# Altium PCB ProbeHead.PcbDoc (part 2 of 2)
Units mm, origin at the board's own origin, x right, y up, seen from the top; angles counter-clockwise.
Board outline 70 x 35 mm, 4 copper layers (L1, L2, L3, L4), stack 1.883 mm thick; 107 components, 62 nets, 327 pads, 211 vias.
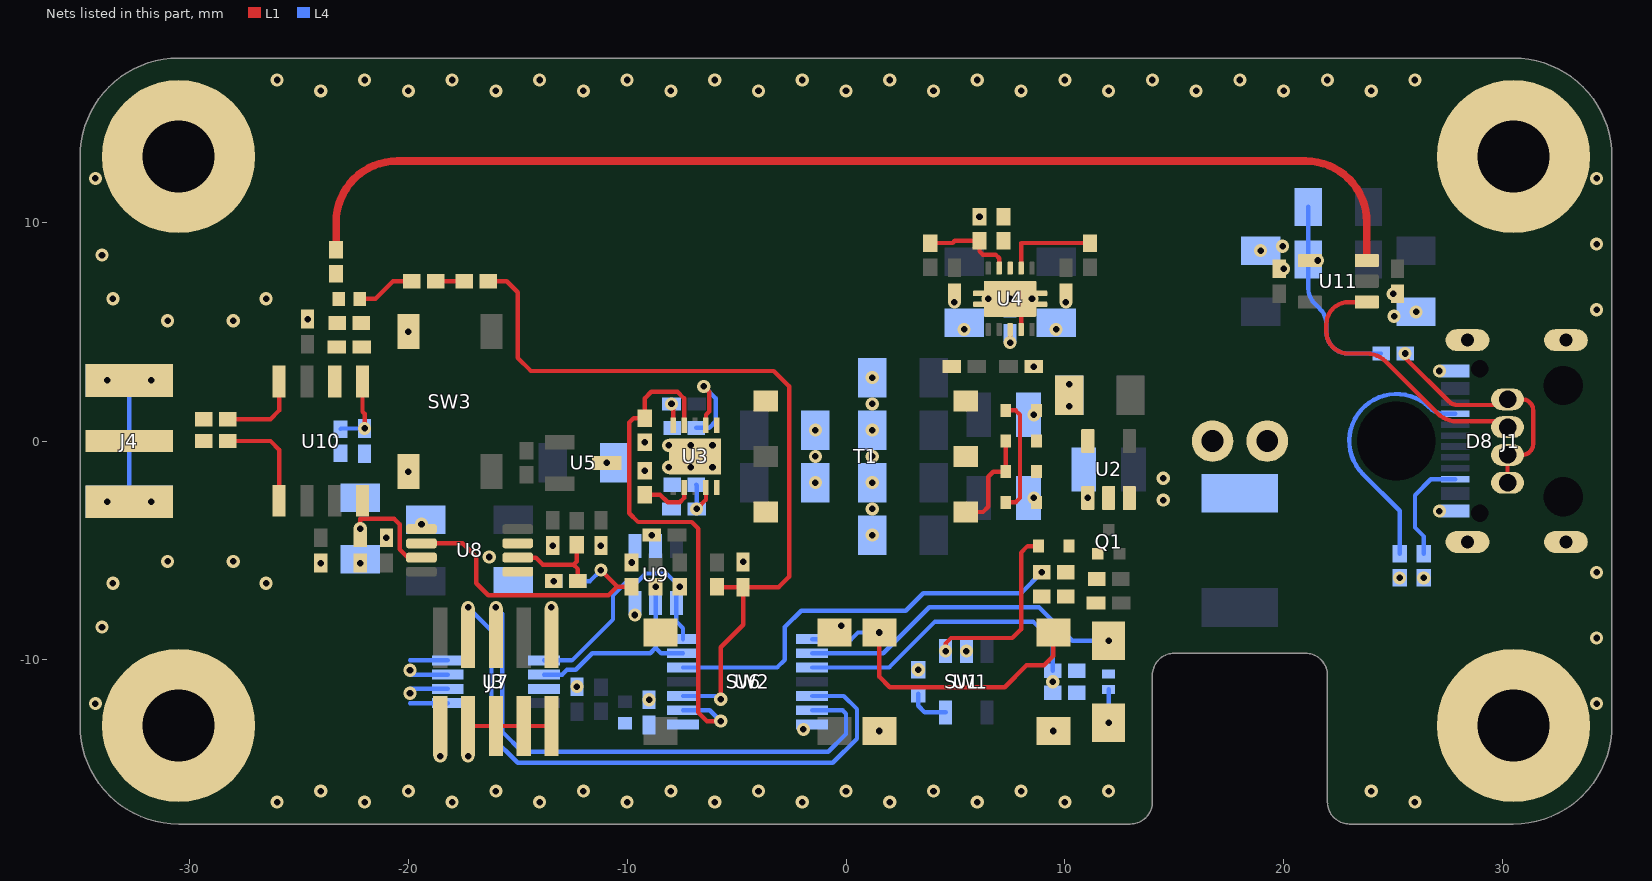
[diagram p4: the nets of this part, all layers, seen from the top]

## Via types
v1: diameter 0.6, hole 0.3, L1 to L4, tented both sides, 211 vias

## Nets (pads, with @x,y where several pads share a name; then routed paths per layer and width w, separated by ;. In a path a pad name is that pad's centre, name@x,y a point inside that pad or via, vN(x,y) a via of type N, cw(c..) or ccw(c..) an arc to the next point about the centre after c; other vN are vias at no path point) (continued)
AMP.EN: R5.2 U3.4 U6.2 | length 24.1
  L1 w0.2: U3.4@-7.4,0.725 -7.4,1.95 -7.7,2.25 -8.9,2.25 -9.2,1.95 R5.2@-9.2,1.05 -9.7,1.05 -9.9,0.85 -9.9,-3.3 -9.5,-3.7 -7.05,-3.7 -6.75,-4 -6.75,-12.4 -6.35,-12.8 v1(-5.725,-12.8)
  L4 w0.2: U6.2@-7.45,-12.3 -6.225,-12.3 v1(-5.725,-12.8)
AMP.IN_N: R27.2 U10.8 | length 3.8
  L1 w0.2: R27.2@-28.25,1 -26.3,1 -25.905,1.395 U10.8@-25.905,2.725
AMP.IN_P: R26.2 U10.1 | length 4.8
  L1 w0.2: R26.2@-28.25,0 -26.3,0 -25.905,-0.395 U10.1@-25.905,-2.725
AMP.OFFSET: C38.2 R16.1 R34.1 U6.3 | length 37
  L1 w0.2: R34.1@-16.35,7.3 -15.5,7.3 -15,6.8 -15,3.8 -14.4,3.2 -3.3,3.2 -2.6,2.5 -2.6,-6.2 -3.075,-6.675 C38.2@-4.7,-6.675 ; R16.1@-5.9,-6.65 -5.875,-6.675 C38.2@-4.7,-6.675 ; v1(-5.725,-11.8) -5.725,-9.425 -4.7,-8.4 C38.2@-4.7,-6.675
  L4 w0.2: U6.3@-7.45,-11.65 -5.983,-11.65 -5.833,-11.8 v1(-5.725,-11.8)
AMP.OUT: R33.2 U11.3 | length 53.3
  L1 w0.349: R33.2@-23.3,8.75 -23.3,10 cw(c-20.5,10) -20.5,12.8 21,12.8 cw(c21,10) 23.8,10 U11.3@23.8,8.25
AMP.REF: C24.2 C30.1 C32.2 R28.1 U8.7 U10.4 | length 4.7
  L1 w0.2: v1(-22.2,-4) -22.2,-3.55 -20.65,-3.55 -20.4,-3.8 -20.4,-4.95 -20.025,-5.325 U8.7@-19.4,-5.325
COM: C2.1 C3.1 C4.1 C5.1 C6.1 C7.1 C8.1 C9.2 C10.2 C11.1 C12.1 C13.2 C14.1 C15.1 C16.1 C17.1 C18.2 C19.2 C20.2 C21.1 C22.1 C23.1 C24.1 C25.1 C26.1 C27.2 C28.2 C29.1 C31.2 C32.1 C34.1 C35.1 C36.2 C37.2 C38.1 J1.0 J1.A1/B12 J1.A12/B1 J2.2 J3.1 J3.3 J3.5 J3.7 J3.9 J3.10 pad. R2.1 R5.1 R6.1 R7.1 R8.1 R9.1 R10.1 R13.1 SW1.3 SW1.4 SW2.1 SW2.2 SW3.1 SW3.2 T1.5 U1.2 U2.2 U2.3 U2.5 U3.5 U3.11 U4.4 U4.11 U5.3 U6.14 U7.1 U7.2 U7.3 U7.4 U7.7 U8.3 U8.5 U9.2 U9.6 | length 13.6
  L1 w0.2: J3.3@-17.27,-13.02 J3.5@-16,-13.02 J3.7@-14.73,-13.02 J3.9@-13.46,-13.02 ; v1(-7.975,1.7) -7.9,1.625 U3.5@-7.9,0.725 ; v1(7.5,6.5) 8,6.5 U4.4@8,5.1
  L4 w0.2: -19.925,-11.975 U7.1@-18.2,-11.975 ; v1@-19.925,-11.325 U7.2@-18.2,-11.325 ; v1@-19.925,-10.675 U7.3@-18.2,-10.675 ; -19.925,-10.025 U7.4@-18.2,-10.025
  other v1: -26,-16.5 -22,-16.5 -18,-16.5 -14,-16.5 -10,-16.5 -6,-16.5 -2,-16.5 2,-16.5 6,-16.5 10,-16.5 26,-16.5 -24,-16 -20,-16 -16,-16 -12,-16 -8,-16 -4,-16 0,-16 4,-16 8,-16 12,-16 24,-16 -18.54,-14.4 -17.27,-14.4 1.525,-13.25 9.475,-13.25 -1.95,-13.175 -34.3,-12 34.3,-12 -9,-11.825 -19.925,-11.525 -12.3,-11.225 -19.925,-10.475 3.3,-10.45 5.5,-9.6 34.3,-9 -34,-8.5 -0.225,-8.45 -9.65,-7.95 -13.46,-7.6 -33.5,-6.5 -26.5,-6.5 25.3,-6.25 26.4,-6.25 34.3,-6 -24,-5.575 -22.2,-5.575 -4.7,-5.525 -31,-5.5 -28,-5.5 -16.3,-5.3 -13.4,-4.775 -11.2,-4.775 -21,-4.425 -8.875,-4.3 1.2,-4.3 -19.4,-3.8 27.116,-3.2 1.2,-3.1 14.5,-2.7 -1.4,-1.9 1.2,-1.9 14.5,-1.7 -20,-1.4 -9.2,-1.35 -8.1,-1.2 -7.1,-1.2 -6.1,-1.2 -10.925,-1 -1.4,-0.7 1.2,-0.7 -8.1,-0.2 -7.1,-0.2 -6.1,-0.2 -9.2,-0.05 -1.4,0.5 1.2,0.5 10.2,1.6 1.2,1.7 10.2,2.6 1.2,2.9 27.116,3.2 8.575,3.4 -20,5 5.4,5.1 9.6,5.1 -31,5.5 -28,5.5 -24.6,5.575 25.05,5.7 26.05,5.9 34.3,6 4.95,6.35 10.05,6.35 -33.5,6.5 -26.5,6.5 6.5,6.5 8.5,6.5 25,6.725 20,7.875 -34,8.5 18.95,8.7 19.95,8.9 34.3,9 6.1,10.25 -34.3,12 34.3,12 -24,16 -20,16 -16,16 -12,16 -8,16 -4,16 0,16 4,16 8,16 12,16 16,16 20,16 24,16 -26,16.5 -22,16.5 -18,16.5 -14,16.5 -10,16.5 -6,16.5 -2,16.5 2,16.5 6,16.5 10,16.5 14,16.5 18,16.5 22,16.5 26,16.5
I2C.SCL: R19.1 U6.6 U7.6 U9.5 | length 9.8
  L4 w0.2: U7.6@-13.8,-10.675 -12.975,-10.675 -12.75,-10.45 -12.349,-10.45 -11.599,-9.7 -8.95,-9.7 -8.7,-9.45 ; v1(-8.7,-6.65) U9.5@-8.7,-7.4 -8.7,-9.45 ; U6.6@-7.45,-9.7 -8.45,-9.7 -8.7,-9.45
I2C.SDA: R18.1 U6.7 U7.5 U9.4 | length 11.3
  L4 w0.2: U7.5@-13.8,-10.025 -12.525,-10.025 -10.65,-8.15 -10.65,-7.05 -10.1,-6.5 -9.6,-6.5 -9.15,-6.05 -8.2,-6.05 v1(-7.6,-6.65) -7.75,-6.8 U9.4@-7.75,-7.4 -7.75,-8.25 -7.45,-8.55 U6.7@-7.45,-9.05
IN_N: J4.2 R27.1 | length 5.5
  L4 w0.2: J4.2@-32.75,-2.77 J4.2@-32.75,2.77
  other v1: -33.75,-2.77 -31.75,-2.77 -33.75,2.77 -31.75,2.77
IN_P: J4.1 R26.1
LED.GRN: R20.2 R21.2 U6.10 | length 13.6
  L4 w0.2: U6.10@-1.55,-10.35 1.969,-10.35 4.069,-8.25 8.55,-8.25 9.45,-9.15 R21.2@9.45,-10.5
  other v1: 9.45,-11
LED.RED: D7.2 U6.9 | length 15.1
  L4 w0.2: U6.9@-1.55,-9.7 1.7,-9.7 3.8,-7.6 8.819,-7.6 10.344,-9.125 v1(12,-9.125)
NetC1_1: C1.1 D1.2 Q1.1 R1.1 R3.2 R4.1
NetC11_2: C11.2 R8.2 U3.9 | length 2.3
  L1 w0.2: v1(-6.825,-3.1) -6.4,-2.675 U3.9@-6.4,-2.125
  L4 w0.2: R8.2@-6.85,-2 -6.825,-2.025 v1(-6.825,-3.1)
NetC13_1: C13.1 U4.3 | length 0.6
  L1 w0.2: v1(7.5,4.5) U4.3@7.5,5.1
NetC21_2: C21.2 L4.2 U6.1
NetC30_2: C30.2 C33.1 R28.2 R29.1 U10.5 | length 3.3
  L1 w0.2: U10.5@-22.095,2.725 -22.095,1.345 -22,1.25 v1(-22,0.575)
  L4 w0.2: R28.2@-23.1,0.55 -23.075,0.575 v1(-22,0.575)
NetC33_2: C33.2 L5.2 R29.2 R33.1 U10.6
NetD1_1: D1.1 U1.1 | length 8.5
  L1 w0.2: v1(4.55,-9.6) 4.55,-9.25 4.8,-9 7.6,-9 8,-8.6 8,-5.1 8.3,-4.8 D1.1@8.8,-4.8
NetD2_1: D2.1 D3.1 L2.1
  other v1: 8.585,-2.6
NetD2_2: D2.2 D4.1 T1.6 | length 5.3
  L1 w0.2: D2.2@7.3,-2.8 7.75,-2.8 7.95,-2.6 7.95,1.2 7.75,1.4 D4.1@7.3,1.4
NetD3_2: D3.2 D5.1 T1.4 | length 4.8
  L1 w0.2: T1.4@5.47,-3.24 6.26,-3.24 6.5,-3 6.5,-1.63 6.73,-1.4 D3.2@7.3,-1.4 D5.1@7.3,0
NetD4_2: D4.2 D5.2 L3.1
  other v1: 8.585,1.2
NetD6_1: D6.1 D7.1 R20.1 | length 1.5
  L4 w0.2: v1(12,-12.875) D6.1@12,-11.35
NetD6_2: D6.2 R21.1
NetD8_1: D8.1 D8.2 D8.4 R30.2 | length 11.6
  L1 w0.2: v1(25.55,4) 25.55,3.811 27.564,1.796 ; 27.564,1.796 ccw(c27.918,2.15) 27.918,1.65 29.975,1.65 D8.4@30.23,1.905 30.9,1.905 cw(c30.9,1.405) 31.4,1.405 31.4,-0.135 cw(c30.9,-0.135) 30.9,-0.635 D8.2@30.23,-0.635 D8.1@30.23,-1.905
NetD8_3: D8.3 U11.1 | length 12.9
  L1 w0.2: U11.1@23.8,6.35 22.964,6.35 ccw(c22.964,5.35) 22.257,6.057 22.243,6.043 ccw(c22.95,5.336) 21.95,5.336 21.95,5 ccw(c22.95,5) 22.95,4 23.782,4 cw(c23.782,2.75) 24.666,3.634 27.034,1.266 ccw(c27.918,2.15) 27.918,0.9 D8.3@29.965,0.9 ; D8.3@30.565,0.9 D8.3@30.83,0.635
NetF1_1: F1.1 J2.1
NetJ1_A5: J1.A5 R7.2 | length 12.3
  L4 w0.2: R7.2@25.3,-5.15 25.3,-3.191 23.63,-1.52 cw(c25.15,0) 26.655,1.536 ccw(c27.355,2.25) 27.355,1.25 J1.A5@27.84,1.25
NetJ1_B5: J1.B5 R6.2 | length 5
  L4 w0.2: R6.2@26.41,-5.15 26.41,-4.362 26,-3.952 26,-2.476 26.726,-1.75 J1.B5@27.84,-1.75
NetL1_2: L1.2 U2.1
  other v1: 11.05,-2.6
NetL5_1: L5.1 R35.2 | length 2.7
  L1 w0.2: L5.1@-22.21,6.5 -21.5,6.5 -20.7,7.3 R35.2@-19.85,7.3
NetR2_2: R2.2 U1.5 | length 1.9
  L4 w0.2: R2.2@3.3,-11.55 3.3,-12.1 3.6,-12.4 U1.5@4.55,-12.4
NetR9_2: R9.2 U3.2 | length 4.8
  L1 w0.2: v1(-6.5,2.5) -6.25,2.25 -6.25,1.35 -6.4,1.2 U3.2@-6.4,0.725
  L4 w0.2: R9.2@-6.85,0.6 -6.25,0.6 -5.95,0.9 -5.95,1.95 v1(-6.5,2.5)
NetR10_2: R10.2 U3.7 | length 2.5
  L1 w0.2: R10.2@-9.2,-2.45 -8.5,-2.45 -8.15,-2.8 -7.6,-2.8 -7.4,-2.6 U3.7@-7.4,-2.125
NetR11_1: R11.1 R13.2 U4.9 | length 4.3
  L1 w0.2: R11.1@3.85,9.05 4.875,9.05 4.975,9.15 R13.2@6.1,9.15 6.1,8.674 6.254,8.52 6.835,8.52 7,8.355 U4.9@7,7.9
NetR14_1: R14.1 R15.2 U4.7 | length 4.3
  L1 w0.2: U4.7@8,7.9 8,9.05 R15.2@11.15,9.05
NetR14_2: R14.2 U4.8
NetR22_1: R22.1 R23.2 U8.2 | length 4.5
  L1 w0.2: U8.2@-15,-5.325 -14.177,-5.325 -13.85,-5.652 -12.448,-5.652 ; R23.2@-12.3,-4.75 -12.3,-5.503 -12.448,-5.652 ; R22.1@-12.25,-6.4 -12.25,-5.85 -12.448,-5.652
NetR22_2: R22.2 R24.1 U8.1
  other v1: -13.35,-6.4
NetR24_2: R24.2 R25.2 U8.6 | length 13.8
  L1 w0.2: U8.6@-19.4,-4.675 -17.525,-4.675 -16.9,-5.3 -16.9,-6.5 -16.35,-7.05 -10.85,-7.05 -10.45,-6.65 ; v1(-11.2,-5.9) -10.45,-6.65 ; R25.2@-9.8,-6.65 -10.45,-6.65
  L4 w0.2: R24.2@-12.25,-6.4 -11.7,-6.4 v1(-11.2,-5.9)
NetR25_1: R25.1 U9.1
  other v1: -9.8,-5.55
NetR30_1: R30.1 R31.2 R32.2 U11.4 | length 9
  L4 w0.2: R31.2@21.125,10.7 R32.2@21.125,8.3 21.125,6.989 ccw(c22.125,6.989) 21.418,6.282 21.657,6.043 cw(c20.95,5.336) 21.95,5.336 21.95,5 ccw(c22.95,5) 22.95,4 R30.1@24.45,4
  other v1: 21.55,8.25
NetR34_2: R34.2 R35.1 | length 1.3
  L1 w0.2: R35.1@-18.75,7.3 R34.2@-17.45,7.3
NetT1_1: T1.1 U3.1
NetT1_3: T1.3 U3.10
PIC.PGC: J3.4 U6.12 | length 27.6
  L4 w0.2: v1(-17.27,-7.6) -16.2,-8.67 -16.2,-13.5 -15,-14.7 -0.6,-14.7 0.5,-13.6 0.5,-12.25 -0.1,-11.65 U6.12@-1.55,-11.65
PIC.PGD: J3.6 U6.13 | length 24.8
  L4 w0.2: v1(-16,-7.6) -15.7,-7.9 -15.7,-13.293 -14.793,-14.2 -0.807,-14.2 0,-13.393 0,-12.457 -0.157,-12.3 U6.13@-1.55,-12.3
PWR.BTN: R4.2 SW1.1 SW1.2 U6.8 | length 15
  L1 w0.2: v1(1.525,-8.75) 1.525,-10.775 2,-11.25 7.25,-11.25 8.25,-10.25 9.05,-10.25 9.475,-9.825 SW1.2@9.475,-8.75
  L4 w0.2: U6.8@-1.55,-9.05 0.25,-9.05 0.55,-8.75 v1(1.525,-8.75)
PWR.LATCH: R3.1 U6.5 | length 19.1
  L4 w0.2: U6.5@-7.45,-10.35 -3.15,-10.35 -2.8,-10 -2.8,-8.5 -2.05,-7.75 2.731,-7.75 3.531,-6.95 8,-6.95 v1(8.95,-6)
pads on no net: D8. J1. J1.A6 J1.A7 J1.A8 J1.B6 J1.B7 J1.B8 U3.6 U3.8

## Polygon pours and split planes (outlines as drawn)
-5V0AMP on L3 "NONET_L-01_P-001" (solid, remove dead copper, pour order 31): -24.65,-4.217 -24.65,-2.717 -24.417,-2.484 -19.029,-2.484 -18.441,-1.896 -18.441,5.409 -14.5,9.35 16.35,9.35 16.825,9.825 24.125,9.825 24.6,9.35 26.95,9.35 26.95,7.45 22.55,7.45 22.55,8.375 21.75,9.175 20.45,9.175 20.45,7.45 18.05,7.45 18,7.5 6.5,7.5 6.5,8.75 4.3,8.75 4.3,7.45 -13.933,7.45 -16.475,4.908 -16.475,-1.896 -15.886,-2.484 -13.516,-2.484 -13,-3 -13,-4.235 -13.215,-4.45 -24.417,-4.45
COM on L3 "NONET_L-01_P-001" (solid, remove dead copper, pour order 30): -35,-17.5 -35,17.5 35,17.5 35,-17.5
+5V0AMP on L3 "NONET_L-01_P-001" (solid, remove dead copper, pour order 18): -25.405,-5.595 -24.35,-6.65 -12.304,-6.65 -9.275,-3.621 -9.275,3.975 -8,5.25 21,5.25 21,7.15 18.05,7.15 17.875,7.325 6.3,7.325 6.3,8.55 4.5,8.55 4.5,7.25 -8.85,7.25 -11.275,4.825 -11.275,0.225 -12.159,-0.659 -15.804,-0.659 -16.275,-1.13 -16.275,-1.813 -15.804,-2.284 -13.433,-2.284 -12.8,-2.917 -12.8,-4.318 -13.132,-4.65 -24.5,-4.65 -24.85,-4.3 -24.85,-2.634 -23.75,-1.534 -23.75,4.85 -25.405,4.85
+VUSB on L3 "NONET_L-01_P-001" (solid, remove dead copper, pour order 14): 6.15,-14.8 6.15,-11.85 12.5,-11.85 12.5,-10.7 cw(c15,-10.7) 15,-8.2 26.05,-8.2 27.989,-6.261 27.989,2.7 35,2.7 35,-3.8 33.8,-3.8 33.8,-6.014 cw(c32,-6.014) 32.1,-7.811 ccw(c32.5,-15) 25.955,-12 cw(c21.591,-10) 21.591,-14.8
+5V0 on L3 "NONET_L-01_P-001" (solid, remove dead copper, pour order 17): -18.865,-12.8 -10.875,-12.8 -10.875,-12.35 -10.72,-12.195 5.95,-12.195 5.95,-8.85 10.269,-8.85 ccw(c10.269,-7.05) 11.695,-8.15 cw(c15,-10.7) 13.65,-6.749 13.65,3 6.83,3 6.83,-5.4 4.43,-5.4 4.43,3 -8.15,3 -8.15,-4.3 -11.1,-7.25 -18.865,-7.25
+8V0AMP on L3 "NONET_L-01_P-001" (solid, remove dead copper, pour order 16): 4.63,-5.2 6.63,-5.2 6.63,4.65 4.63,4.65
+VBATT on L3 "NONET_L-01_P-001" (solid, remove dead copper, pour order 2): 6.15,-11.65 6.15,-9.05 10.269,-9.05 ccw(c10.269,-7.05) 11.853,-8.272 cw(c15,-10.7) 15,-6.725 19.75,-6.725 19.75,-8 15,-8 ccw(c15,-10.7) 12.3,-10.7 12.3,-11.65
COM on L4 "NONET_L-01_P-001" (solid, remove dead copper, pour order 24): -35,4.5 -35,13 cw(c-30.5,13) -30.5,17.5 30.5,17.5 cw(c30.5,13) 35,13 35,4 34,4 34,6.014 ccw(c32,6.014) 32.111,8.011 cw(c32.5,15) 26.137,12.083 ccw(c21.591,10) 21.591,15 -20.5,15 ccw(c-20.5,10) -25.5,10 -25.5,4.5
COM on L4 "NONET_L-01_P-001" (solid, remove dead copper, pour order 23): 22,-16.5 ccw(c23,-16.5) 23,-17.5 30.5,-17.5 ccw(c30.5,-13) 35,-13 35,-4 34,-4 34,-6.014 cw(c32,-6.014) 32.111,-8.011 ccw(c32.5,-15) 26.137,-12.083 cw(c21.591,-10) 22,-14.983
COM on L4 "NONET_L-01_P-001" (solid, remove dead copper, pour order 22): -35,-13 ccw(c-30.5,-13) -30.5,-17.5 13,-17.5 ccw(c13,-16.5) 14,-16.5 14,-15 -20.5,-15 cw(c-20.5,-10) -25.5,-10 -25.5,-4.5 -35,-4.5
COM on L1 "NONET_L-01_P-001" (solid, remove dead copper, pour order 26): -35,-13 ccw(c-30.5,-13) -30.5,-17.5 13,-17.5 ccw(c13,-16.5) 14,-16.5 14,-15 -20.5,-15 cw(c-20.5,-10) -25.5,-10 -25.5,-4.5 -35,-4.5
COM on L1 "NONET_L-01_P-001" (solid, remove dead copper, pour order 25): 22,-16.5 ccw(c23,-16.5) 23,-17.5 30.5,-17.5 ccw(c30.5,-13) 35,-13 35,-4 34,-4 34,-6.014 cw(c32,-6.014) 32.111,-8.011 ccw(c32.5,-15) 26.137,-12.083 cw(c21.591,-10) 22,-14.983
COM on L1 "NONET_L-01_P-001" (solid, remove dead copper, pour order 27): -35,4.5 -35,13 cw(c-30.5,13) -30.5,17.5 30.5,17.5 cw(c30.5,13) 35,13 35,4 34,4 34,6.014 ccw(c32,6.014) 32.111,8.011 cw(c32.5,15) 26.137,12.083 ccw(c21.591,10) 21.591,15 -20.5,15 ccw(c-20.5,10) -25.5,10 -25.5,4.5
COM on L2 "NONET_L-01_P-001" (solid, remove dead copper, pour order 0): -30.5,-17.5 13,-17.5 ccw(c13,-16.5) 14,-16.5 14,-10.7 cw(c15,-10.7) 15,-9.7 21,-9.7 cw(c21,-10.7) 22,-10.7 22,-16.5 ccw(c23,-16.5) 23,-17.5 30.5,-17.5 ccw(c30.5,-13) 35,-13 35,13 ccw(c30.5,13) 30.5,17.5 -30.5,17.5 ccw(c-30.5,13) -35,13 -35,-13 ccw(c-30.5,-13)

## Other copper
L1:
  rectangle net COM: 32.9,4.11 34.3,5.11
  rectangle net COM: 32.9,-5.11 34.3,-4.11
  region net COM: 18.05,7.45 18.05,9.35 20.4,9.35 20.4,7.45
  region net +5V0AMP: 18.05,5.25 20.4,5.25 20.4,7.15 18.05,7.15
  region net -5V0AMP: 24.6,7.45 24.6,9.35 26.95,9.35 26.95,7.45
  region net COM: 24.6,5.25 24.6,6.85 24.9,7.15 26.95,7.15 26.95,5.25
  region net +8V0AMP: 5.55,3.1 5.55,4.623 ccw(c5.4,5.1) 5.9,5.1 5.9,5.475 7.125,5.475 7.125,4.712 ccw(c7.5,4.5) 7.069,4.5 7.069,4.269 7,4.269 ccw(c7,4.069) 6.8,4.069 6.8,3.1
  region net NetT1_1: -6.025,0.375 -6.025,1.075 -5.9,1.2 -5.9,2.32 -3.11,2.32 -3.11,1.05 -4.85,1.05 ccw(c-4.85,0.8) -5.1,0.8 -5.1,0.375
  region net -8V0AMP: 7,3.1 7,4.069 7.5,4.069 ccw(c7.5,4.5) 7.931,4.5 7.931,4.6 8.375,4.6 8.375,5.1 8.625,5.1 8.625,3.9 8.15,3.9 ccw(c8.15,3.7) 7.95,3.7 7.95,3.1
  region net COM: 5.35,3.1 5.35,4.804 ccw(c5.4,5.1) 5.7,5.1 5.7,5.675 8.825,5.675 8.825,3.9 cw(c8.625,3.9) 8.625,3.7 8.15,3.7 8.15,3.1 9,3.1 9.55,2.55 9.55,-0.55 11.35,-0.55 11.35,7.325 4.2,7.325 4.2,3.1
  region net NetT1_3: -6.025,-3.72 -3.11,-3.72 -3.11,-2.45 -4.85,-2.45 cw(c-4.85,-2.2) -5.1,-2.2 -5.1,-1.775 -6.025,-1.775
  region net NetC33_2: -23.665,3.45 -23.7,3.485 -23.7,8.05 -22.85,8.05 -22.85,3.665 -23.065,3.45 -23.065,2 -23.665,2
  region net NetD4_2: 8.25,-0.3 8.95,-0.3 8.95,1.7 8.25,1.7
  region net NetD2_1: 8.25,-3.1 8.95,-3.1 8.95,-1.1 8.25,-1.1
  region net NetD2_2: 4.91,1.1 7.55,1.1 7.55,2.32 4.91,2.32
  region net COM: -9.95,-9.4 -7.7,-9.4 -7.7,-7.6 -9.95,-7.6
  region net PWR.BTN: 8.55,-9.4 8.55,-6.775 9.35,-6.775 9.35,-7.7 10.25,-7.7 10.25,-9.4
  region net COM: 9.55,-0.55 11.35,-0.55 11.35,3 9.55,3
  region net COM: 11.7,-3.15 14.85,-3.15 14.85,-1.35 11.7,-1.35
  region net -5V0AMP: 8.375,7.5 8.375,8.2 8.85,8.2 9,8.35 11.475,8.35 11.475,7.5
  region net +5V0AMP: 3.525,7.5 3.525,8.35 6,8.35 6.15,8.2 6.625,8.2 6.625,7.5
  region net NetR14_1: 6.875,9.85 6.875,10.65 7.7,10.65 8.125,10.225 8.125,7.9 7.875,7.9 7.875,9.5 7.525,9.85
  region net NetR14_2: 6.875,8.75 6.875,9.55 7.525,9.55 7.625,9.45 7.625,7.9 7.375,7.9 7.375,8.413 7.038,8.75
  region net COM: 0.55,-5.2 0.55,3.8 4,3.8 4,0.5 6.03,0.5 6.03,-1.9 4,-1.9 4,-5.2
  region net +5V0: 12.35,-0.55 13.65,-0.55 13.65,3 12.35,3
  region net +VSW: 11.7,-4.315 11.7,-3.45 13.35,-3.45 13.35,-4.315
  region net +VBATT: 12.15,-7.7 12.15,-4.885 13,-4.885 13,-6.325 13.4,-6.725 19.75,-6.725 19.75,-8.505 13.15,-8.505 13.15,-7.85 13,-7.7
  region net NetC1_1: 9.65,-7.425 9.65,-4.5 10.85,-4.5 11.235,-4.885 11.85,-4.885 11.85,-7.7 11,-7.7 10.725,-7.425
  region net +5V0: -4.85,-2.2 -3.11,-2.2 -3.11,0.8 -4.85,0.8
  region net +5V0AMP: -21.3,-6 -21.3,-5.15 -20.7,-5.15 -20.691,-5.159 -20.1,-5.75 -19.4,-5.75 -19.4,-6.2 -20.5,-6.2 -20.7,-6
  region net NetR22_2: -15,-6.2 -14.475,-6.725 -12.95,-6.725 -12.95,-6.075 -13.975,-6.075 -14.3,-5.75 -15,-5.75
  region net COM: -15,-4.9 -15,-4.45 -13.8,-4.45 -13.7,-4.35 -13.1,-4.35 -13.1,-5.2 -13.85,-5.2 -14.15,-4.9
  region net -5V0AMP: -15,-4.25 -15,-3.8 -14.3,-3.8 -13.7,-3.2 -13.1,-3.2 -13.1,-4.05 -13.7,-4.05 -13.9,-4.25
  region net +5V0AMP: -24.935,2 -24.3,2 -24.3,4.85 -24.935,4.85
  region net +5V0: -9.025,-5.95 -9.025,-5.15 -8.15,-5.15 -8.15,-4 -7.275,-4 -7.275,-5.95
  region net +2V50REF: -13.75,-2.8 -13.75,-0.85 -14.925,-0.85 -14.925,0.275 -12.4,0.275 -12.4,-2.275 -12.075,-2.6 -10.9,-2.6 -10.9,-4.05 -12.625,-4.05 -12.625,-3.075 -12.9,-2.8
  region net -5V0AMP: -24.935,-4.85 -24.3,-4.85 -24.3,-2 -24.935,-2
  region net AMP.REF: -22.5,-4.85 -22.5,-2 -21.795,-2 -21.795,-4.85
  region net NetC30_2: -22.55,3.605 -22.55,5.725 -21.7,5.725 -21.7,3.545 -21.795,3.45 -21.795,2 -22.395,2 -22.395,3.45
  region net IN_N: -34.75,2.02 -34.75,3.52 -30.22,3.52 -29.6,2.9 -29.6,1.575 -29.35,1.325 -28.95,1.325 -28.95,0.675 -29.75,0.675 -30.1,1.025 -30.1,1.7 -30.42,2.02
  region net IN_P: -34.75,-0.5 -34.75,0.5 -30.75,0.5 -29.75,0.325 -28.95,0.325 -28.95,-0.325 -29.75,-0.325 -30.75,-0.5
L2:
  pour cut-out: 20.5,7.425 21.75,7.425 21.75,11.575 20.5,11.575
  pour cut-out: -23.665,3.45 -23.7,3.485 -23.7,8.05 -22.85,8.05 -22.85,3.665 -23.065,3.45 -23.065,2 -23.665,2
  pour cut-out: -22.55,3.605 -22.55,5.725 -21.7,5.725 -21.7,3.545 -21.795,3.45 -21.795,2 -22.395,2 -22.395,3.45
  pour cut-out: 24.35,7.95 24.35,8.55 23.25,8.55 23.25,7.95
  pour cut-out: 29.28,-2.605 31.18,-2.605 31.18,2.605 29.28,2.605
  pour cut-out: 23.85,3.475 26.15,3.475 26.15,4.525 23.85,4.525
  pour cut-out: -35,-4.5 -35,4.5 -25.405,4.5 -25.405,-4.5
L3:
  pour cut-out: 20.5,9.825 20.5,11.575 21.75,11.575 21.75,9.825
  pour cut-out: 20.5,7.425 21.75,7.425 21.75,9.175 20.5,9.175
  pour cut-out: 23.25,7.95 23.25,8.55 24.35,8.55 24.35,7.95
  pour cut-out: -23.665,3.45 -23.7,3.485 -23.7,8.05 -22.85,8.05 -22.85,3.665 -23.065,3.45 -23.065,2 -23.665,2
  pour cut-out: -22.55,3.605 -22.55,5.725 -21.7,5.725 -21.7,3.545 -21.795,3.45 -21.795,2 -22.395,2 -22.395,3.45
  pour cut-out: -23.425,0.15 -23.425,1 -21.7,1 -21.7,0.15
  pour cut-out: 29.28,-2.605 29.28,2.605 31.18,2.605 31.18,-2.605
  pour cut-out: 23.85,3.475 26.15,3.475 26.15,4.525 23.85,4.525
  pour cut-out: -35,-4.5 -25.405,-4.5 -25.405,4.5 -35,4.5
L4:
  rectangle net COM: 32.9,4.11 34.3,5.11
  rectangle net COM: 32.9,-5.11 34.3,-4.11
  region net -5V0AMP: 23.25,7.425 23.25,11.575 25.828,11.575 ccw(c32.5,15) 26.95,9.955 26.95,7.425
  region net COM: 24.6,5.25 24.6,7.15 26.95,7.15 26.95,5.25
  region net NetF1_1: 15.8,-2.825 16.25,-3.275 19.75,-3.275 19.75,-1.495 18.545,-1.495 17.7,-0.65 17.7,0 ccw(c16.75,0) 16.75,0.95 ccw(c16.75,0) 15.8,0
  region net +2V50REF: -14.925,-0.85 -14.925,-0.05 -12.75,-0.05 -12.75,-1.9 -14.05,-1.9 -14.05,-0.85
  region net COM: -11.25,-1.9 -10.893,-1.9 -10,-2.793 -10,-3.4 -7.55,-3.4 -7.55,-1.525 -5.71,-1.525 -5.71,0.125 -7.55,0.125 -7.55,2 -10,2 -10,0.793 -10.893,-0.1 -11.25,-0.1
  region net COM: -21.2,-6.05 -21.2,-5.05 -18.1,-5.05 -18.1,-7.05 -14.65,-7.05 -14.25,-7.45 -14.25,-7.95 -13.1,-7.95 -13.1,-6.925 -13.95,-6.925 -13.95,-5.875 -13.1,-5.875 -13.1,-4.45 -16.3,-4.45 -16.3,-2.95 -21.1,-2.95 -21.1,-4.083 -21.567,-4.55 -23.1,-4.55 -23.1,-6.05
  region net +5V0AMP: -21,-7.05 -21,-5.25 -18.3,-5.25 -18.3,-7.05
  region net -5V0AMP: -16.1,-4.25 -16.1,-2.95 -13.1,-2.95 -13.1,-4.25
  region net COM: -20.3,-12.15 -19.55,-12.15 -19.55,-9.85 -20.3,-9.85
  region net COM: 4.5,4.75 4.5,6.8 10.5,6.8 10.5,4.75 8.7,4.75 8.7,5.65 6.3,5.65 6.3,4.75
  region net -8V0AMP: 3.35,-0.4 3.35,3.8 6.9,3.8 7,3.7 7.85,3.7 7.85,3.1 7,3.1 6.63,2.73 6.63,-0.4
  region net +VBATT: 6.15,-10.15 6.15,-9.05 7.75,-9.05 7.75,-10.15
  region net +VUSB: 6.15,-12.95 6.15,-11.85 7.75,-11.85 7.75,-12.95
  region net +8V0AMP: 3.35,-5.2 3.35,-1 6.63,-1 6.63,-5.2
  region net COM: 0.55,-5.2 0.55,3.8 1.85,3.8 1.85,-5.2
  region net COM: -2.05,-2.8 -2.05,1.4 -0.75,1.4 -0.75,-2.8
  region net LED.GRN: 9.05,-11.825 9.85,-11.825 9.85,-10.175 9.05,-10.175
  region net NetD6_1: 10.15,-11.825 10.15,-11.15 12.3,-11.15 12.3,-11.825
  region net NetD6_2: 10.15,-10.85 10.15,-10.175 12.3,-10.175 12.3,-10.85
  region net +VSW: 11.735,-4.315 13.7,-4.315 13.7,-0.29 11.735,-0.29
  region net NetL1_2: 10.3,-2.95 10.3,-0.29 11.43,-0.29 11.43,-2.95
  region net +5V0: -4.85,-2.8 -4.85,1.4 -3.55,1.4 -3.55,-2.8
  region net AMP.REF: -23.1,-4 -23.1,-1.95 -23.425,-1.625 -23.425,-0.15 -21.7,-0.15 -21.3,-0.55 -21.3,-4 -21.65,-4.35 -22.75,-4.35
  region net COM: -14.525,-11.55 -14.525,-11.1 -12.9,-11.1 -12.6,-10.8 -12,-10.8 -12,-11.65 -12.6,-11.65 -12.7,-11.55
  region net NetC21_2: -10.42,-13.4 -10.42,-12.55 -8.35,-12.55 -8.175,-12.725 -6.725,-12.725 -6.725,-13.175 -8.175,-13.175 -8.4,-13.4
  region net +5V0: -14.525,-12.8 -14.525,-11.75 -13.075,-11.75 -12.875,-11.95 -10.745,-11.95 -10.42,-11.625 -9.78,-11.625 -9.78,-12.195 -10.72,-12.195 -10.875,-12.35 -10.875,-12.8

## Silkscreen, mask and mechanical layers (free items; w line width, h text height)
Top Overlay:
  text "Optically Isolated" at -19.621,9.573 h4.5
  text "Probe Head" at -12.313,6.231 h4.5
  text "Judd Foster | Feb 2025" at -13.973,4.7 h1
  text "Rev. A" at -1.971,3.2 h1
Top Solder:
  rectangle: 32.9,-5.11 35,-4.11
  rectangle: 32.9,4.11 35,5.11
  region: 22,-16.5 ccw(c23,-16.5) 23,-17.5 30.5,-17.5 ccw(c30.5,-13) 35,-13 35,-4 34,-4 34,-6.014 cw(c32,-6.014) 32.111,-8.011 ccw(c32.5,-15) 26.137,-12.083 cw(c21.591,-10) 22,-14.983
  region: -35,-13 ccw(c-30.5,-13) -30.5,-17.5 13,-17.5 ccw(c13,-16.5) 14,-16.5 14,-15 -20.5,-15 cw(c-20.5,-10) -25.5,-10 -25.5,-4.5 -35,-4.5
  region: -35,4.5 -35,13 cw(c-30.5,13) -30.5,17.5 30.5,17.5 cw(c30.5,13) 35,13 35,4 34,4 34,6.014 ccw(c32,6.014) 32.111,8.011 cw(c32.5,15) 26.137,12.083 ccw(c21.591,10) 21.591,15 -20.5,15 ccw(c-20.5,10) -25.5,10 -25.5,4.5
Bottom Solder:
  rectangle: 32.9,4.11 35,5.11
  rectangle: 32.9,-5.11 35,-4.11
  region: 22,-16.5 ccw(c23,-16.5) 23,-17.5 30.5,-17.5 ccw(c30.5,-13) 35,-13 35,-4 34,-4 34,-6.014 cw(c32,-6.014) 32.111,-8.011 ccw(c32.5,-15) 26.137,-12.083 cw(c21.591,-10) 22,-14.983
  region: -35,-13 ccw(c-30.5,-13) -30.5,-17.5 13,-17.5 ccw(c13,-16.5) 14,-16.5 14,-15 -20.5,-15 cw(c-20.5,-10) -25.5,-10 -25.5,-4.5 -35,-4.5
  region: -35,4.5 -35,13 cw(c-30.5,13) -30.5,17.5 30.5,17.5 cw(c30.5,13) 35,13 35,4 34,4 34,6.014 ccw(c32,6.014) 32.111,8.011 cw(c32.5,15) 26.137,12.083 ccw(c21.591,10) 21.591,15 -20.5,15 ccw(c-20.5,10) -25.5,10 -25.5,4.5
Mechanical 1:
  the board outline again, w0.2
KEEPOUT_TOP:
  circle w0.1: c-30.5,13 r1.65
  circle w0.1: c30.5,13 r1.65
  circle w0.1: c-30.5,-13 r1.65
  circle w0.1: c30.5,-13 r1.65
  lines w0.1: -35,-13 ccw(c-30.5,-13) -30.5,-17.5 30.5,-17.5 ccw(c30.5,-13) 35,-13 35,-4 34,-4 34,-6.014 cw(c32,-6.014) 32.111,-8.011 ccw(c32.5,-15) 26.137,-12.083 cw(c21.591,-10) 21.591,-15 -20.5,-15 cw(c-20.5,-10) -25.5,-10 -25.5,-4.5 -35,-4.5 -35,-13 ; -35,4.5 -35,13 cw(c-30.5,13) -30.5,17.5 30.5,17.5 cw(c30.5,13) 35,13 35,4 34,4 34,6.014 ccw(c32,6.014) 32.111,8.011 cw(c32.5,15) 26.137,12.083 ccw(c21.591,10) 21.591,15 -20.5,15 ccw(c-20.5,10) -25.5,10 -25.5,4.5 -35,4.5
KEEPOUT_BOTTOM:
  circle w0.1: c30.5,13 r1.65
  circle w0.1: c-30.5,13 r1.65
  circle w0.1: c30.5,-13 r1.65
  circle w0.1: c-30.5,-13 r1.65
  lines w0.1: -35,-13 ccw(c-30.5,-13) -30.5,-17.5 30.5,-17.5 ccw(c30.5,-13) 35,-13 35,-6 34,-6 34,-6.014 cw(c32,-6.014) 32.111,-8.011 ccw(c32.5,-15) 26.137,-12.083 cw(c21.591,-10) 21.591,-15 -20.5,-15 cw(c-20.5,-10) -25.5,-10 -25.5,-4.5 -35,-4.5 -35,-13 ; -35,4.5 -25.5,4.5 -25.5,10 cw(c-20.5,10) -20.5,15 21.591,15 cw(c21.591,10) 26.137,12.083 ccw(c32.5,15) 32.111,8.011 cw(c32,6.014) 34,6.014 34,6 35,6 35,13 ccw(c30.5,13) 30.5,17.5 -30.5,17.5 ccw(c-30.5,13) -35,13 -35,4.5
Fab Notes:
  lines w0.1: -35,23 17,23 ; -19,20 -19,26 ; -8,20 -8,26 ; 6,20 6,26 ; -35,20 -35,26 17,26 17,20 -35,20 ; -35,32 -19,32 -19,35 -35,35 -35,32
  text "Stackup" at -33.75,36.25 h1.5
  text "JLC04161H-7628" at -33.8,32.8 h1
  text "Impedance" at -33.75,27.25 h1.5
  text "Signal Layer" at -18,24 h1
  text "Reference Layer" at -7,24 h1
  text "Trace Width" at 7,24 h1
  text "Impedance Type" at -33.8,23.8 h1
  text "50 Ohm Microstrip" at -34,21 h1
  text "0.3493" at 7,21 h1
  text "L1" at -17.8,20.8 h1
  text "L2" at -6.8,20.8 h1
OL1:
  drawing of 300 lines, arcs and shapes, not listed
OL2:
  lines w0.01: -35,-4.5 -35,4.5 -25.405,4.5 -25.405,-4.5 -35,-4.5
  lines w0.02: 20.5,7.425 21.75,7.425 21.75,11.575 20.5,11.575 20.5,7.425
  lines w0.04: 23.25,7.95 24.35,7.95 24.35,8.55 23.25,8.55 23.25,7.95
  lines w0.05: -22.55,5.725 -22.55,3.605 -22.395,3.45 -22.395,2 -21.795,2 -21.795,3.45 -21.7,3.545 -21.7,5.725 -22.55,5.725 ; -22.55,5.725 -22.55,5.725 ; -23.7,3.485 -23.7,8.05 -22.85,8.05 -22.85,3.665 -23.065,3.45 -23.065,2 -23.665,2 -23.665,3.45 -23.7,3.485 ; 23.85,3.475 23.85,4.525 26.15,4.525 26.15,3.475 23.85,3.475 ; 29.28,-2.605 31.18,-2.605 31.18,2.605 29.28,2.605 29.28,-2.605
  lines w0.1: -35,-13 ccw(c-30.5,-13) -30.5,-17.5 13,-17.5 ccw(c13,-16.5) 14,-16.5 14,-10.7 cw(c15,-10.7) 15,-9.7 21,-9.7 cw(c21,-10.7) 22,-10.7 22,-16.5 ccw(c23,-16.5) 23,-17.5 30.5,-17.5 ccw(c30.5,-13) 35,-13 35,13 ccw(c30.5,13) 30.5,17.5 -30.5,17.5 ccw(c-30.5,13) -35,13 -35,-13
OL3:
  drawing of 162 lines, arcs and shapes, not listed
OL4:
  drawing of 214 lines, arcs and shapes, not listed

## Text inside footprints (layer, text, board x,y; h text height)
D8: Top Courtyard "PCB EDGE" at 34.45,1.7 h0.5 r270
J1: Bottom Courtyard "PCB Edge" at 34.783,1.648 h0.5 r90
J4: Top Courtyard "PCB Edge" at -35.217,-1.648 h0.5 r90